# Altium PCB NB3000XN.PcbDoc (part 47 of 71)
Units mil, origin at the board's own origin, x right, y up, seen from the top; angles counter-clockwise.
Board outline 9527.56 x 6929.77 mil, 6 copper layers (Top Layer, GND+SHIELD, MidLayer1, MidLayer2, P2 - 3V3+5V0, Bottom Layer), stack 62.375 mil thick; 832 components, 1027 nets, 4655 pads, 4981 vias.
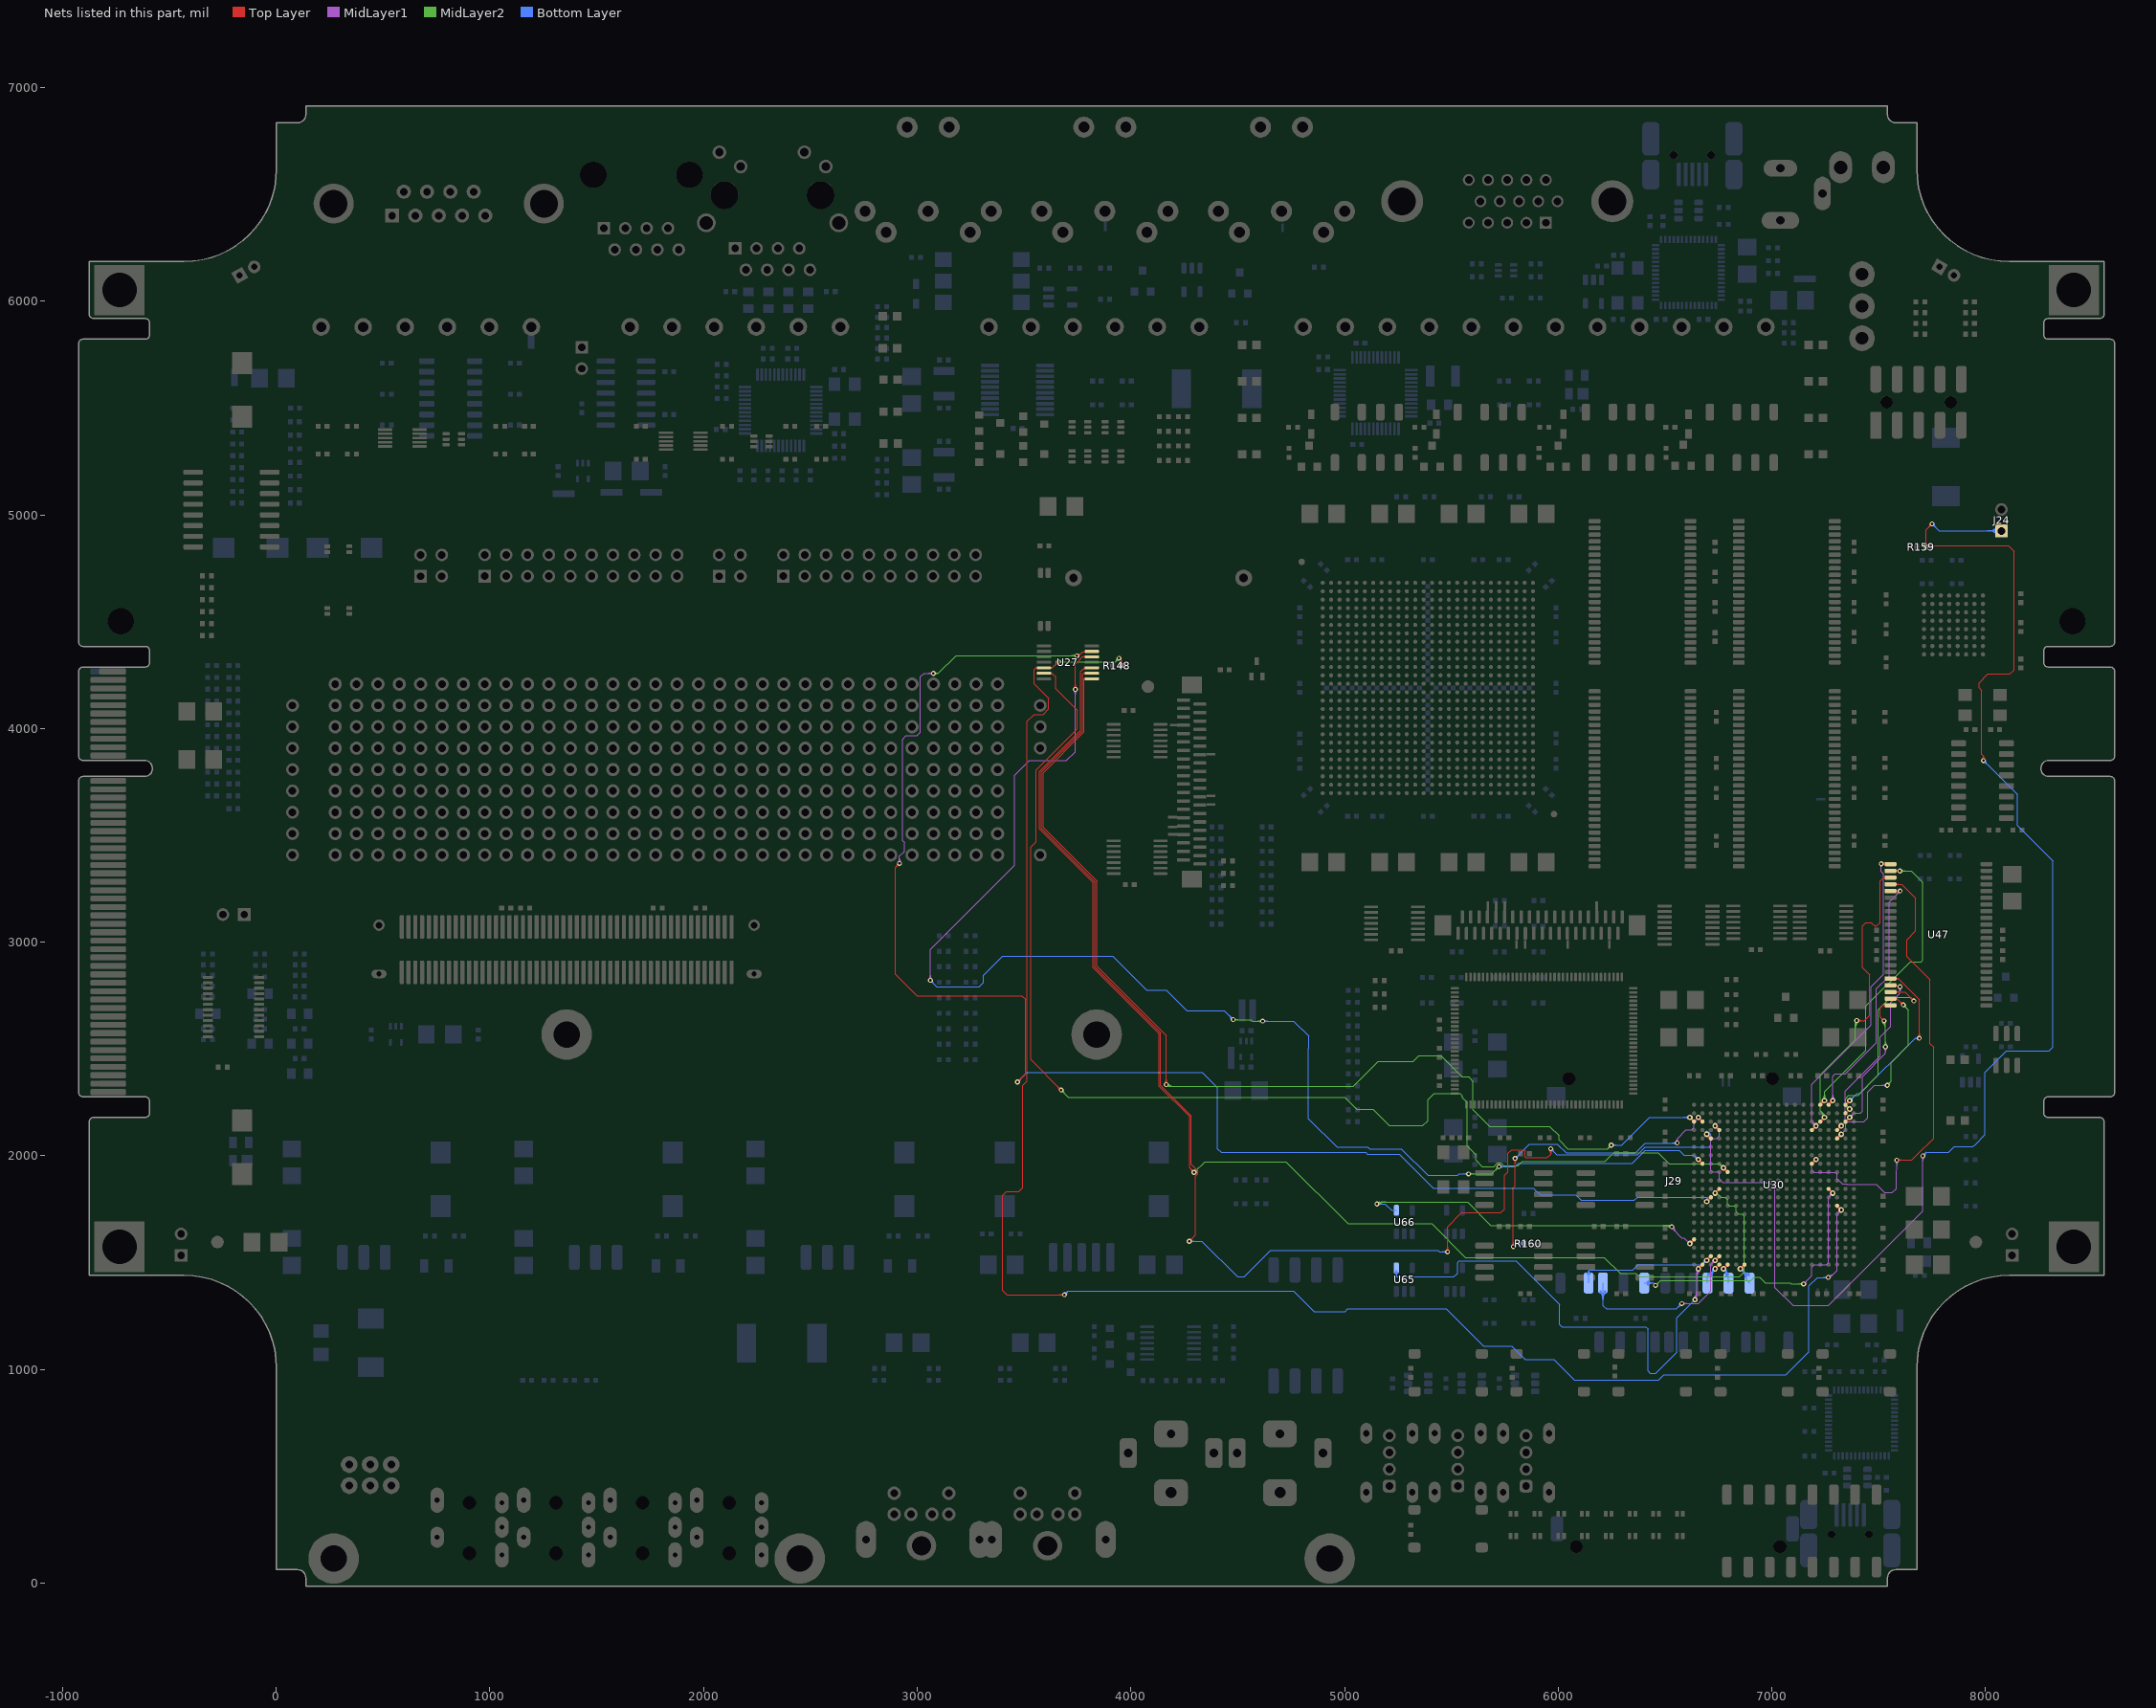
[diagram p51: the nets of this part, all layers, seen from the top]

## Via types
v1: diameter 23, hole 11.81, Top Layer to Bottom Layer, 3672 vias
v2: diameter 26, hole 11.81, Top Layer to Bottom Layer, 461 vias
v3: diameter 19, hole 11.81, Top Layer to Bottom Layer, tented both sides, 396 vias
v4: diameter 23.62, hole 11.81, Top Layer to Bottom Layer, 288 vias
v5: diameter 20, hole 11.81, Top Layer to Bottom Layer, 91 vias
v6: diameter 23, hole 11.81, Top Layer to Bottom Layer, tented both sides, 50 vias
v7: diameter 31, hole 11.81, Top Layer to Bottom Layer, 15 vias
v8: diameter 27.56, hole 11.81, Top Layer to Bottom Layer, tented both sides, 4 vias
v9: diameter 29, hole 11.81, Top Layer to Bottom Layer, 3 vias
v10: diameter 21, hole 11.81, Top Layer to Bottom Layer, 1 vias

## Nets (pads, with @x,y where several pads share a name; then routed paths per layer and width w, separated by ;. In a path a pad name is that pad's centre, name@x,y a point inside that pad or via, vN(x,y) a via of type N, cw(c..) or ccw(c..) an arc to the next point about the centre after c; other vN are vias at no path point) (continued)
HOST_M1: J24.1 R159.1 U30.U4 | length 7649.8
  Top Layer w4: R159.1@7714.59,4857.08 ccw(c7698.68,4872.99) 7721.18,4872.99 ccw(c7743.68,4872.99) R159.1@7727.77,4857.08 ; R159.1@7717.42,4854.25 ccw(c7708.34,4863.33) 7721.18,4863.33 ccw(c7734.02,4863.33) R159.1@7724.94,4854.25 ; R159.1@7722.11,4849.56 cw(c7740.08,4831.6) 7740.08,4857 ; R159.1@7724.94,4846.73 cw(c7749.73,4821.94) 7749.73,4857 ; R159.1@7727.77,4843.9 cw(c7759.39,4812.28) 7759.39,4857 ; v1@7740.69,4958.37 cw(c7717.76,4958.37) 7733.97,4942.16 cw(c7750.19,4925.94) v1@7750.19,4948.87 ; v1@7744.69,4958.37 cw(c7731.41,4958.37) 7740.8,4948.99 cw(c7750.19,4939.6) v1@7750.19,4952.87 ; v1(7750.19,4958.37) 7721.18,4929.37 R159.1@7721.18,4850 7728.18,4857 8107.71,4857 8135,4829.71 8135,4275 8115,4255 8011.82,4255 7970.52,4213.71 7970.52,4190 7981.86,4178.67 7981.86,3880 7990.19,3871.67 ; v1@7983.76,3857.04 ccw(c7970.33,3871.67) 7990.19,3871.67 ; v1@7986.47,3854.09 ccw(c7978.69,3862.56) 7990.19,3862.56 ccw(c8001.69,3862.56) v1@7993.91,3854.09 ; v1(7990.19,3850.04) 7990.19,3871.67 ; v1@7996.62,3857.04 cw(c8010.05,3871.67) 7990.19,3871.67
  Top Layer w8: v2@6734.41,2131.59 cw(c6734.41,2109.86) 6749.77,2125.23 cw(c6765.14,2140.59) v2@6743.41,2140.59 ; v2(6734.41,2140.59) U30.U4@6754.09,2120.91 ; U30.U4@6748.25,2120.91 ccw(c6734.15,2120.91) 6744.12,2130.88 ccw(c6754.09,2140.85) U30.U4@6754.09,2126.75
  MidLayer1 w4: v2@6734.41,2129.59 cw(c6734.41,2103.03) 6753.19,2121.81 cw(c6771.96,2140.59) v2@6745.41,2140.59 ; v2@6734.41,2133.59 cw(c6734.41,2116.69) 6746.36,2128.64 cw(c6758.31,2140.59) v2@6741.41,2140.59 ; v2(6734.41,2140.59) 6753.52,2121.48 6753.52,2091.71 6743.19,2081.37 6726.86,2081.37 6715.19,2069.71 6715.19,1932.37 6723.52,1924.04 6751.86,1924.04 6754.19,1921.71 6754.19,1891.71 6770.86,1875.04 6990.19,1875.04 7015.19,1850.04 7015.19,1383.37 7098.52,1300.04 7265.19,1300.04 7706.86,1741.71 v1(7706.86,2000.04) ; v1@7700.14,1993.32 cw(c7683.92,1977.11) 7706.86,1977.11 cw(c7729.79,1977.11) v1@7713.57,1993.32 ; v1@7702.97,1996.15 cw(c7693.58,1986.76) 7706.86,1986.76 cw(c7720.14,1986.76) v1@7710.75,1996.15
  Bottom Layer w4: v1(7706.86,2000.04) 7723.52,2016.71 7827.77,2016.71 7853.56,2042.5 7940.98,2042.5 7954.24,2055.76 7998.52,2100.04 7998.52,2391.71 8098.52,2491.71 8298.52,2491.71 8315.19,2508.37 8315.19,3380.39 8148.86,3546.73 8148.86,3691.37 8023.52,3816.71 v1(7990.19,3850.04) ; v1@7706.86,2005.54 ccw(c7706.86,2018.82) 7716.25,2009.43 ccw(c7725.64,2000.04) v1@7712.36,2000.04 ; v1@7706.86,2009.54 ccw(c7706.86,2032.48) 7723.07,2016.26 ccw(c7739.29,2000.04) v1@7716.36,2000.04 ; v1@7750.19,4948.87 cw(c7750.19,4925.94) 7766.41,4942.16 cw(c7782.63,4958.37) v1@7759.69,4958.37 ; v1@7750.19,4952.87 cw(c7750.19,4939.6) 7759.58,4948.99 cw(c7768.97,4958.37) v1@7755.69,4958.37 ; v1(7750.19,4958.37) 7783.19,4925.38 J24.1@8074.71,4925.38 ; v1@7990.19,3840.54 cw(c7990.19,3817.61) 8006.41,3833.82 cw(c8022.63,3850.04) v1@7999.69,3850.04 ; v1@7990.19,3844.54 cw(c7990.19,3831.26) 7999.58,3840.65 cw(c8008.97,3850.04) v1@7995.69,3850.04 ; J24.1@8055.24,4905.91 ccw(c8008.25,4858.92) 8008.25,4925.38 ccw(c8008.25,4991.84) J24.1@8055.24,4944.84 ; J24.1@8058.07,4908.74 ccw(c8017.91,4868.58) 8017.91,4925.38 ccw(c8017.91,4982.18) J24.1@8058.07,4942.01 ; J24.1@8060.9,4911.57 ccw(c8027.57,4878.23) 8027.57,4925.38 ccw(c8027.56,4972.52) J24.1@8060.9,4939.19 ; J24.1@8063.73,4914.4 ccw(c8037.22,4887.89) 8037.22,4925.38 ccw(c8037.22,4962.86) J24.1@8063.73,4936.36
HOST_M2: R160.1 U30.W3 | length 1865.2
  Top Layer w4: v1@5783.47,1581.76 ccw(c5767.26,1597.98) 5790.19,1597.98 ccw(c5813.13,1597.98) v1@5796.91,1581.76 ; v1@5786.3,1578.93 ccw(c5776.91,1588.32) 5790.19,1588.32 ccw(c5803.47,1588.32) v1@5794.08,1578.93 ; v1(5790.19,1575.04) 5790.19,1850.04 5798.52,1858.37 v1(5798.52,1988.04) ; v1@5791.81,1981.32 cw(c5775.59,1965.11) 5798.52,1965.11 cw(c5821.46,1965.11) v1@5805.24,1981.32 ; v1@5794.64,1984.15 cw(c5785.25,1974.76) 5798.52,1974.76 cw(c5811.8,1974.76) v1@5802.41,1984.15
  Top Layer w8: v2@6655.67,2170.96 cw(c6655.67,2149.23) 6671.03,2164.6 cw(c6686.4,2179.96) v2@6664.67,2179.96 ; v2(6655.67,2179.96) U30.W3@6675.35,2160.28 ; U30.W3@6669.51,2160.28 ccw(c6655.41,2160.28) 6665.38,2170.25 ccw(c6675.35,2180.22) U30.W3@6675.35,2166.12
  MidLayer1 w4: v1@6551.05,2067.56 ccw(c6541.94,2079.37) 6556.86,2079.37 ; v1(6556.86,2060.04) 6556.86,2079.37 ; v1@6562.66,2067.56 cw(c6571.78,2079.37) 6556.86,2079.37 ; v2(6655.67,2179.96) 6640.19,2164.48 6640.19,2163.48 6638.52,2161.82 6637.52,2161.82 6636.52,2160.82 6636.52,2133.37 6624.19,2121.04 6598.52,2121.04 6556.86,2079.37
  Bottom Layer w4: v1(5790.19,1575.04) 5805.15,1590 R160.1@5839.87,1590 ; v1(5798.52,1988.04) 5843.85,2033.36 5865.48,2055 5996.25,2055 6037.06,2014.19 6362.67,2014.19 6364.86,2016.37 6408.52,2060.04 v1(6556.86,2060.04) ; v1@5798.52,1993.54 ccw(c5798.52,2006.82) 5807.91,1997.43 ccw(c5817.3,1988.04) v1@5804.02,1988.04 ; v1@5798.52,1997.54 ccw(c5798.52,2020.48) 5814.74,2004.26 ccw(c5830.96,1988.04) v1@5808.02,1988.04 ; R160.1@5833.29,1583.41 ccw(c5817.38,1567.5) 5817.38,1590 ccw(c5817.38,1612.5) R160.1@5833.29,1596.59 ; R160.1@5836.11,1586.24 ccw(c5827.03,1577.16) 5827.03,1590 ccw(c5827.03,1602.84) R160.1@5836.11,1593.76 ; v1@6550.14,2053.32 ccw(c6533.92,2037.11) 6533.92,2060.04 ccw(c6533.92,2082.98) v1@6550.14,2066.76 ; v1@6552.97,2056.15 ccw(c6543.58,2046.76) 6543.58,2060.04 ccw(c6543.58,2073.32) v1@6552.97,2063.93
HOST_RTC.CLKOE: U27.12 U30.W8 | length 7212.1
  Top Layer w4: v1@3733.47,4190.09 ccw(c3717.26,4206.31) 3740.19,4206.31 ccw(c3763.13,4206.31) v1@3746.91,4190.09 ; v1@3736.3,4187.26 ccw(c3726.91,4196.65) 3740.19,4196.65 ccw(c3753.47,4196.65) v1@3744.08,4187.26 ; v1(3740.19,4183.37) 3740.19,4300.78 3754.62,4315.21 3775,4335.59 U27.12@3817.2,4335.59 ; U27.12@3787.17,4332.13 ccw(c3778.82,4323.79) 3778.82,4335.59 ccw(c3778.83,4347.39) U27.12@3787.17,4339.05
  Top Layer w8: v2@6655.67,1974.11 cw(c6655.67,1952.38) 6671.03,1967.75 cw(c6686.4,1983.11) v2@6664.67,1983.11 ; v2(6655.67,1983.11) U30.W8@6675.35,1963.43 ; U30.W8@6669.51,1963.43 ccw(c6655.41,1963.43) 6665.38,1973.4 ccw(c6675.35,1983.37) U30.W8@6675.35,1969.27
  MidLayer1 w4: v1@3054.81,2828.43 ccw(c3038.59,2844.64) 3061.52,2844.64 ccw(c3084.46,2844.64) v1@3068.24,2828.43 ; v1@3057.64,2825.6 ccw(c3048.25,2834.99) 3061.52,2834.99 ccw(c3074.8,2834.99) v1@3065.41,2825.6 ; v1(3061.52,2821.71) 3061.52,2966.02 3456.86,3361.36 3456.86,3781 3525.9,3850.04 3698.52,3850.04 3740.19,3891.71 v1(3740.19,4183.37) ; v1@3733.47,4176.66 cw(c3717.26,4160.44) 3740.19,4160.44 cw(c3763.13,4160.44) v1@3746.91,4176.66 ; v1@3736.3,4179.49 cw(c3726.91,4170.1) 3740.19,4170.1 cw(c3753.47,4170.1) v1@3744.08,4179.49
  MidLayer2 w4: v1(4478.86,2638.04) 4563,2638.04 4570,2631.04 v1(4616.86,2631.04) ; v1@4482.75,2634.15 cw(c4492.14,2624.76) 4492.14,2638.04 cw(c4492.14,2651.32) v1@4482.75,2641.93 ; v1@4485.57,2631.32 cw(c4501.79,2615.11) 4501.79,2638.04 cw(c4501.79,2660.98) v1@4485.57,2644.76 ; v1@4610.14,2624.32 ccw(c4593.92,2608.11) 4593.92,2631.04 ccw(c4593.92,2653.98) v1@4610.14,2637.76 ; v1@4612.97,2627.15 ccw(c4603.58,2617.76) 4603.58,2631.04 ccw(c4603.58,2644.32) v1@4612.97,2634.93 ; v1@5580.6,1913.79 v1(5580.6,1915.37) 5688.85,1915.37 v1(5723.52,1950.04) ; v1@5584.49,1911.48 cw(c5593.88,1902.09) 5593.88,1915.37 cw(c5593.88,1928.65) v1@5584.49,1919.26 ; v1@5587.32,1908.65 cw(c5603.54,1892.43) 5603.54,1915.37 cw(c5603.54,1938.3) v1@5587.32,1922.09 ; v1@5714.02,1950.04 cw(c5691.09,1950.04) 5707.31,1933.82 cw(c5723.52,1917.61) v1@5723.52,1940.54 ; v1@5718.02,1950.04 cw(c5704.75,1950.04) 5714.14,1940.65 cw(c5723.52,1931.26) v1@5723.52,1944.54
  Bottom Layer w4: v1@3061.52,2812.21 cw(c3061.52,2789.27) 3077.74,2805.49 cw(c3093.96,2821.71) v1@3071.02,2821.71 ; v1@3061.52,2816.21 cw(c3061.52,2802.93) 3070.91,2812.32 cw(c3080.3,2821.71) v1@3067.02,2821.71 ; v1(3061.52,2821.71) 3091.52,2791.71 3290.19,2791.71 3310.81,2812.32 3310.81,2845.81 3399.37,2934.37 3914.19,2934.37 4073.52,2775.04 4165.19,2775.04 4261.19,2679.04 4437.86,2679.04 v1(4478.86,2638.04) ; v1@4469.36,2638.04 ccw(c4446.42,2638.04) 4462.64,2654.26 ccw(c4478.86,2670.48) v1@4478.86,2647.54 ; v1@4473.36,2638.04 ccw(c4460.08,2638.04) 4469.47,2647.43 ccw(c4478.86,2656.82) v1@4478.86,2643.54 ; v1(4616.86,2631.04) 4761.56,2631.04 4832.19,2560.41 4832.19,2502.81 ; v1@4620.75,2627.15 cw(c4630.14,2617.76) 4630.14,2631.04 cw(c4630.14,2644.32) v1@4620.75,2634.93 ; v1@4623.57,2624.32 cw(c4639.79,2608.11) 4639.79,2631.04 cw(c4639.79,2653.98) v1@4623.57,2637.76 ; 4831.86,2502.81 4831.86,2174.04 4964.19,2041.71 5108.19,2041.71 5116.52,2033.37 5266.15,2033.37 5391.15,1908.37 5530,1908.37 5536.99,1915.37 v1(5580.6,1915.37) v1@5580.6,1913.79 ; v1@5573.88,1908.65 ccw(c5557.67,1892.43) 5557.67,1915.37 ccw(c5557.67,1938.3) v1@5573.88,1922.09 ; v1@5576.71,1911.48 ccw(c5567.32,1902.09) 5567.32,1915.37 ccw(c5567.32,1928.65) v1@5576.71,1919.26 ; v1(5723.52,1950.04) 5798.52,1950.04 5814.52,1966.04 6347.86,1966.04 6406.86,2025.04 6567.52,2025.04 6589.86,2002.71 6636.07,2002.71 v2(6655.67,1983.11) ; v1@5727.41,1946.15 cw(c5736.8,1936.76) 5736.8,1950.04 cw(c5736.8,1963.32) v1@5727.41,1953.93 ; v1@5730.24,1943.32 cw(c5746.46,1927.11) 5746.46,1950.04 cw(c5746.46,1972.98) v1@5730.24,1956.76 ; v2@6644.67,1983.11 ccw(c6618.11,1983.11) 6636.89,2001.89 ccw(c6655.67,2020.67) v2@6655.67,1994.11 ; v2@6648.67,1983.11 ccw(c6631.77,1983.11) 6643.72,1995.06 ccw(c6655.67,2007.01) v2@6655.67,1990.11
HOST_RTC.CLKOUT: U27.13 U30.V12 | length 7676.6
  Top Layer w4: v1@2907.69,3368.71 cw(c2884.76,3368.71) 2900.97,3352.49 cw(c2917.19,3336.27) v1@2917.19,3359.21 ; v1@2911.69,3368.71 cw(c2898.41,3368.71) 2907.8,3359.32 cw(c2917.19,3349.93) v1@2917.19,3363.21 ; v1(2917.19,3368.71) 2898.52,3350.04 2898.52,2850.04 2999.02,2749.54 3490.46,2749.54 3507.19,2732.81 3507.19,2383.71 v1(3469.52,2346.04) ; v1@3469.52,2351.54 ccw(c3469.52,2364.82) 3478.91,2355.43 ccw(c3488.3,2346.04) v1@3475.02,2346.04 ; v1@3469.52,2355.54 ccw(c3469.52,2378.48) 3485.74,2362.26 ccw(c3501.96,2346.04) v1@3479.02,2346.04 ; v1(3747.52,4340.37) 3755.52,4340.37 3773.52,4358.37 ; v1@3747.71,4341.86 ccw(c3749.78,4358.89) 3761.91,4346.76 ; v1@3748.19,4345.83 ccw(c3751.04,4369.24) 3767.72,4352.57 ; v1@3748.67,4349.81 ccw(c3752.3,4379.59) 3773.52,4358.37 ; 3782.42,4358.37 ccw(c3782.42,4368.46) U27.13@3789.96,4361.77 ; U27.13@3786.97,4364.42 cw(c3773.53,4376.34) 3773.53,4358.37 ; U27.13@3817.2,4361.18 3790.63,4361.17 3790.63,4358.37 3773.52,4358.37
  Top Layer w8: v2(6695.04,1786.26) U30.V12@6714.72,1805.94 ; v2@6695.04,1795.26 ccw(c6695.04,1816.99) 6710.4,1801.62 ccw(c6725.77,1786.26) v2@6704.04,1786.26 ; U30.V12@6708.88,1805.94 cw(c6694.78,1805.94) 6704.75,1795.97 cw(c6714.72,1786) U30.V12@6714.72,1800.1
  MidLayer1 w4: v1@2910.47,3375.43 ccw(c2894.26,3391.64) 2917.19,3391.64 ccw(c2940.13,3391.64) v1@2923.91,3375.43 ; v1@2913.3,3372.6 ccw(c2903.91,3381.99) 2917.19,3381.99 ccw(c2930.47,3381.99) v1@2921.08,3372.6 ; v1(2917.19,3368.71) 2917.19,3402.04 2940.19,3425.04 2940.19,3466.71 2931.86,3475.04 2931.86,3950.04 2948.52,3966.71 2998.52,3966.71 3015.19,3983.37 3015.19,4241.71 3031.86,4258.37 v1(3075.86,4258.37) ; v1@3069.14,4251.66 ccw(c3052.92,4235.44) 3052.92,4258.37 ccw(c3052.92,4281.31) v1@3069.14,4265.09 ; v1@3071.97,4254.49 ccw(c3062.58,4245.1) 3062.58,4258.37 ccw(c3062.58,4271.65) v1@3071.97,4262.26
  MidLayer2 w4: v1(3075.86,4258.37) 3098.52,4258.37 ; v1@3079.78,4254.52 cw(c3088.98,4245.47) 3088.98,4258.37 cw(c3088.98,4271.28) v1@3079.78,4262.23 ; v1@3082.63,4251.71 cw(c3098.52,4236.09) 3098.52,4258.37 ; v1@3082.63,4265.04 ccw(c3098.52,4280.66) 3098.52,4258.37 ; 3721.37,4341.71 cw(c3721.37,4314.22) v1@3740.81,4333.66 ; 3727.81,4341.71 ccw(c3727.81,4360.09) v1@3740.81,4347.09 ; 3731.03,4341.71 cw(c3731.03,4323.88) v1@3743.64,4336.49 ; v1(3747.52,4340.37) 3746.19,4341.71 3181.86,4341.71 3098.52,4258.37
  Bottom Layer w4: v1(3469.52,2346.04) 3515.19,2391.71 4334.84,2391.71 4406.52,2320.02 4406.52,2033.16 4422.98,2016.71 5099.25,2016.71 5107.25,2008.71 5256.52,2008.71 5277.07,1988.16 5415.52,1849.71 5883.17,1849.71 5916.17,1816.71 6081.86,1816.71 6106.86,1791.71 6356.86,1791.71 6371.52,1806.37 6696.86,1806.37 6698.52,1804.71 ; v1@3469.52,2351.54 ccw(c3469.52,2364.82) 3478.91,2355.43 ccw(c3488.3,2346.04) v1@3475.02,2346.04 ; v1@3469.52,2355.54 ccw(c3469.52,2378.48) 3485.74,2362.26 ccw(c3501.96,2346.04) v1@3479.02,2346.04 ; v2@6692.43,1796.95 ccw(c6690.53,1804.71) 6698.52,1804.71 ; v2@6693.38,1793.06 ccw(c6691.78,1799.61) 6698.52,1799.61 ; v2(6695.04,1786.26) 6698.52,1786.26 6698.52,1804.71 ; 6698.52,1804.4 ccw(c6713.18,1804.4) v2@6702.82,1794.04
HOST_RTC.CS_N: U27.6 U30.T9 | length 6107.5
  Top Layer w4: U27.6@3592.8,4258.82 3631.41,4258.82 3648.52,4241.71 3648.52,4186.73 3749.19,4086.06 3749.19,3998.34 3557.19,3806.34 3557.19,3470.33 3531.86,3445 3531.86,2450.04 v1(3673.52,2308.37) ; U27.6@3622.83,4255.36 cw(c3631.17,4247.01) 3631.17,4258.82 cw(c3631.18,4270.62) U27.6@3622.83,4262.28 ; v1@3664.02,2308.37 ccw(c3641.09,2308.37) 3657.31,2324.59 ccw(c3673.52,2340.81) v1@3673.52,2317.87 ; v1@3668.02,2308.37 ccw(c3654.75,2308.37) 3664.14,2317.76 ccw(c3673.52,2327.15) v1@3673.52,2313.87
  Top Layer w8: v2@6773.78,1934.74 cw(c6773.78,1913.01) 6789.14,1928.38 cw(c6804.51,1943.74) v2@6782.78,1943.74 ; v2(6773.78,1943.74) U30.T9@6793.46,1924.06 ; U30.T9@6787.62,1924.06 ccw(c6773.52,1924.06) 6783.49,1934.03 ccw(c6793.46,1944) U30.T9@6793.46,1929.9
  MidLayer2 w4: v1@3673.52,2298.87 cw(c3673.52,2275.94) 3689.74,2292.16 cw(c3705.96,2308.37) v1@3683.02,2308.37 ; v1@3673.52,2302.87 cw(c3673.52,2289.6) 3682.91,2298.99 cw(c3692.3,2308.37) v1@3679.02,2308.37 ; v1(3673.52,2308.37) 3707.19,2274.71 5001.84,2274.71 5057.53,2219.02 5132.88,2219.02 5210.19,2141.71 5366.9,2141.71 5390.19,2165 5390.19,2263.04 5418.86,2291.71 5540.19,2291.71 5552.19,2279.71 5552.19,2272.62 5575,2249.81 5575,2045 5614.02,2005.98 5614.02,1980 5644.02,1950 5698.73,1950 5716.28,1967.54 5730.77,1967.54 5743.77,1954.54 5812.4,1954.54 5831.57,1973.71 6219.57,1973.71 6260.05,2014.19 6467.71,2014.19 6518.86,1963.04 6754.48,1963.04 v2(6773.78,1943.74) ; v2@6762.78,1943.74 ccw(c6736.22,1943.74) 6755,1962.52 ccw(c6773.78,1981.3) v2@6773.78,1954.74 ; v2@6766.78,1943.74 ccw(c6749.88,1943.74) 6761.83,1955.69 ccw(c6773.78,1967.64) v2@6773.78,1950.74
HOST_RTC.DIN: U27.9 U30.V5 | length 6833.9
  Top Layer w4: U27.9@3787.17,4255.36 ccw(c3778.83,4247.01) 3778.83,4258.82 ; U27.9@3787.17,4262.28 cw(c3778.82,4270.62) 3778.82,4258.82 ; U27.9@3817.2,4258.82 3778.82,4258.82 ; v1(4273.52,1600.04) 4303.2,1629.72 4303.2,1905.16 4313.46,1915.41 4313.46,1929.91 4282.52,1960.84 4282.52,2187.48 4140,2330 4140,2575.9 3832,2883.9 3832,3282.56 3581.19,3533.37 3581.19,3796.39 3773.52,3988.73 3773.52,4253.52 3778.82,4258.82 ; v1@4273.52,1605.54 ccw(c4273.52,1618.82) 4282.91,1609.43 ccw(c4292.3,1600.04) v1@4279.02,1600.04 ; v1@4273.52,1609.54 ccw(c4273.52,1632.48) 4289.74,1616.26 ccw(c4305.96,1600.04) v1@4283.02,1600.04 ; v1(5481.86,1550.04) 5481.86,1666.71 5548.52,1733.37 5731.86,1733.37 5748.52,1750.04 5748.52,1908.37 5765.19,1925.04 5765.19,2011.71 5781.86,2028.37 5843.86,2028.37 5845.52,2026.71 5845.52,1993.37 5847.19,1991.71 5948.52,1991.71 5965.19,2008.37 v1(5965.19,2033.37) ; v1@5958.47,2026.66 cw(c5942.26,2010.44) 5965.19,2010.44 cw(c5988.13,2010.44) v1@5971.91,2026.66 ; v1@5961.3,2029.49 cw(c5951.91,2020.1) 5965.19,2020.1 cw(c5978.47,2020.1) v1@5969.08,2029.49 ; 5481.86,1563.32 cw(c5468.58,1563.32) 5477.97,1553.93 ccw(c5468.58,1563.32) 5481.86,1563.32 ; 5481.86,1563.32 ccw(c5495.14,1563.32) 5485.75,1553.93 cw(c5495.14,1563.32) 5481.86,1563.32 ; 5481.86,1572.98 cw(c5458.92,1572.98) 5475.14,1556.76 ccw(c5458.92,1572.98) 5481.86,1572.98 ; 5481.86,1572.98 ccw(c5504.79,1572.98) 5488.57,1556.76 cw(c5504.79,1572.98) 5481.86,1572.98
  Top Layer w8: v2@6695.04,2092.22 cw(c6695.04,2070.49) 6710.4,2085.86 cw(c6725.77,2101.22) v2@6704.04,2101.22 ; v2(6695.04,2101.22) U30.V5@6714.72,2081.54 ; U30.V5@6708.88,2081.54 ccw(c6694.78,2081.54) 6704.75,2091.51 ccw(c6714.72,2101.48) U30.V5@6714.72,2087.38
  Bottom Layer w4: v1(4273.52,1600.04) 4331.86,1600.04 4498.52,1433.37 4530,1433.37 4600.69,1504.06 4653.63,1557 5438,1557 5444.96,1550.04 v1(5481.86,1550.04) ; v1@4277.41,1596.15 cw(c4286.8,1586.76) 4286.8,1600.04 cw(c4286.8,1613.32) v1@4277.41,1603.93 ; v1@4280.24,1593.32 cw(c4296.46,1577.11) 4296.46,1600.04 cw(c4296.46,1622.98) v1@4280.24,1606.76 ; v1@5475.14,1543.32 ccw(c5458.92,1527.11) 5458.92,1550.04 ccw(c5458.92,1572.98) v1@5475.14,1556.76 ; v1@5477.97,1546.15 ccw(c5468.58,1536.76) 5468.58,1550.04 ccw(c5468.58,1563.32) v1@5477.97,1553.93 ; v1@5965.19,2023.87 cw(c5965.19,2000.94) 5981.41,2017.16 cw(c5997.63,2033.37) v1@5974.69,2033.37 ; v1@5965.19,2027.87 cw(c5965.19,2014.6) 5974.58,2023.99 cw(c5983.97,2033.37) v1@5970.69,2033.37 ; v1(5965.19,2033.37) 5992.38,2006.19 6371.34,2006.19 6406.86,2041.71 6706.86,2041.71 6715.19,2050.04 6715.19,2100.04 6706.86,2108.37 6695.04,2108.37 v2(6695.04,2101.22) ; 6687.37,2111.71 cw(c6695.33,2100.82) 6704.87,2110.36 ; v2@6689.73,2108.49 cw(c6698.12,2097.01) 6708.17,2107.06 ; v2@6692.09,2105.26 cw(c6700.91,2093.2) 6711.47,2103.76 ; v2@6694.45,2102.03 cw(c6703.7,2089.38) 6714.77,2100.46
HOST_RTC.DOUT: U27.8 U30.Y3 | length 5564
  Top Layer w4: U27.8@3786.55,4230.53 ccw(c3781.52,4227.19) 3781.52,4233.23 ; U27.8@3786.55,4235.93 cw(c3781.52,4239.26) 3781.52,4233.23 ; U27.8@3817.2,4233.23 3781.52,4233.23 ; 3840,3205 3840,3285.88 3589.19,3536.69 3589.19,3793.08 3781.52,3985.41 3781.52,4233.23 ; 3840.19,3205 3840.19,2887.02 4165.19,2562.02 v1(4165.19,2333.37) ; v1@4158.47,2340.09 ccw(c4142.26,2356.31) 4165.19,2356.31 ccw(c4188.13,2356.31) v1@4171.91,2340.09 ; v1@4161.3,2337.26 ccw(c4151.91,2346.65) 4165.19,2346.65 ccw(c4178.47,2346.65) v1@4169.08,2337.26
  Top Layer w8: v2@6616.3,2170.96 cw(c6616.3,2149.23) 6631.66,2164.6 cw(c6647.03,2179.96) v2@6625.3,2179.96 ; v2(6616.3,2179.96) U30.Y3@6635.98,2160.28 ; U30.Y3@6630.14,2160.28 ccw(c6616.04,2160.28) 6626.01,2170.25 ccw(c6635.98,2180.22) U30.Y3@6635.98,2166.12
  MidLayer2 w4: v1@4163.42,2331.61 ccw(c4179.27,2347.46) 4179.27,2325.04 ; v1(4165.19,2333.37) 4173.52,2325.04 5041.35,2325.04 5158.02,2441.71 5321.52,2441.71 5348.52,2468.71 5451.29,2468.71 5550,2370 5580,2370 5602.19,2347.81 5602.19,2275 ; v1@4166.25,2334.44 ccw(c4188.93,2357.12) 4188.93,2325.04 ; v1@4169.08,2337.26 ccw(c4198.59,2366.77) 4198.59,2325.04 ; v1@4171.91,2340.09 ccw(c4208.25,2376.43) 4208.25,2325.04 ; 5602.19,2290 5602.19,2275 ; v1@6239.02,2050.04 cw(c6216.09,2050.04) 6232.31,2033.82 cw(c6248.52,2017.61) v1@6248.52,2040.54 ; v1@6243.02,2050.04 cw(c6229.75,2050.04) 6239.13,2040.65 cw(c6248.52,2031.26) v1@6248.52,2044.54 ; v1(6248.52,2050.04) 6231.86,2033.37 6045.56,2033.37 6004.5,2074.44 6004.5,2094.06 5960.19,2138.37 5678.81,2138.37 5602.19,2215 5602.19,2275
  Bottom Layer w4: v1(6248.52,2050.04) 6298.52,2050.04 6428.44,2179.96 v2(6616.3,2179.96) ; v1@6252.41,2046.15 cw(c6261.8,2036.76) 6261.8,2050.04 cw(c6261.8,2063.32) v1@6252.41,2053.93 ; v1@6255.24,2043.32 cw(c6271.46,2027.11) 6271.46,2050.04 cw(c6271.46,2072.98) v1@6255.24,2056.76 ; v2@6608.52,2172.18 ccw(c6589.74,2153.4) 6589.74,2179.96 ccw(c6589.74,2206.52) v2@6608.52,2187.74 ; v2@6611.35,2175.01 ccw(c6599.4,2163.06) 6599.4,2179.96 ccw(c6599.4,2196.86) v2@6611.35,2184.91
HOST_RTC.INT_N: R148.2 U27.5 U30.C13 | length 8985.1
  Top Layer w4: U27.5@3562.29,4281.5 ccw(c3556.52,4277.24) 3556.52,4284.41 ; U27.5@3562.29,4287.32 cw(c3556.52,4291.58) 3556.52,4284.41 ; U27.5@3622.83,4280.95 cw(c3631.17,4272.61) 3631.17,4284.41 cw(c3631.18,4296.22) U27.5@3622.83,4287.87 ; v1@3652.02,4312.37 cw(c3629.09,4312.37) 3645.31,4296.16 cw(c3661.52,4279.94) v1@3661.52,4302.87 ; v1@3656.02,4312.37 cw(c3642.75,4312.37) 3652.14,4302.99 cw(c3661.52,4293.6) v1@3661.52,4306.87 ; v1(3661.52,4312.37) 3633.56,4284.41 3556.52,4284.41 ; v1@3682.47,1343.32 ccw(c3666.26,1327.11) 3666.26,1350.04 ccw(c3666.26,1372.98) v1@3682.47,1356.76 ; v1@3685.3,1346.15 ccw(c3675.91,1336.76) 3675.91,1350.04 ccw(c3675.91,1363.32) v1@3685.3,1353.93 ; v1(3689.19,1350.04) 3419.96,1350.04 3400,1370 3400,1815 3418,1833 3476.69,1833 3495,1851.31 3495,2329.81 3515.19,2350 3515.19,4033.37 3548.52,4066.71 3590.19,4066.71 3615.19,4091.71 3615.19,4141.71 3548.52,4208.37 3548.52,4276.41 3556.52,4284.41 ; v1(3944.52,4329.37) 3956.18,4317.72 ; R148.2@3949.65,4302.14 ccw(c3934.34,4317.72) 3956.18,4317.72 ; R148.2@3952.45,4299.29 ccw(c3943.71,4308.18) 3956.18,4308.18 ccw(c3968.65,4308.18) R148.2@3959.91,4299.29 ; R148.2@3956.18,4295 3956.18,4317.72 ; R148.2@3962.71,4302.14 cw(c3978.02,4317.72) 3956.18,4317.72
  Top Layer w8: U30.C13@7305.28,1760.73 cw(c7305.28,1746.63) 7315.25,1756.6 cw(c7325.22,1766.57) U30.C13@7311.12,1766.57 ; U30.C13@7305.28,1766.57 v2(7324.96,1746.89) ; v2@7315.96,1746.89 ccw(c7294.23,1746.89) 7309.6,1762.25 ccw(c7324.96,1777.62) v2@7324.96,1755.89
  MidLayer1 w4: v1(7263.86,1431.04) 7272.2,1431.04 7305,1463.84 7305,1726.93 v2(7324.96,1746.89) ; v1@7263.86,1432.54 ccw(c7263.86,1456.31) 7280.66,1439.5 ; v1@7263.86,1436.54 ccw(c7263.86,1469.97) 7287.49,1446.33 ; v1@7263.86,1440.54 ccw(c7263.86,1483.62) 7294.32,1453.16 ; v2@7313.96,1746.89 cw(c7287.4,1746.89) 7306.18,1728.11 cw(c7324.96,1709.33) v2@7324.96,1735.89 ; v2@7317.96,1746.89 cw(c7301.06,1746.89) 7313.01,1734.94 cw(c7324.96,1722.99) v2@7324.96,1739.89
  MidLayer2 w4: v1(3661.52,4312.37) 3927.52,4312.37 v1(3944.52,4329.37) ; v1@3665.41,4308.49 cw(c3674.8,4299.1) 3674.8,4312.37 cw(c3674.8,4325.65) v1@3665.41,4316.26 ; v1@3668.24,4305.66 cw(c3684.46,4289.44) 3684.46,4312.37 cw(c3684.46,4335.31) v1@3668.24,4319.09 ; v1@3935.02,4329.37 cw(c3912.09,4329.37) 3928.31,4313.16 cw(c3944.52,4296.94) v1@3944.52,4319.87 ; v1@3939.02,4329.37 cw(c3925.75,4329.37) 3935.14,4319.99 cw(c3944.52,4310.6) v1@3944.52,4323.87
  Bottom Layer w4: v1(3689.19,1350.04) 3706.19,1367.04 4761.88,1367.04 4856.92,1272 5003.31,1272 5014.69,1283.37 5475.9,1283.37 5650.27,1109 5783.6,1109 5838.8,1053.8 5845.6,1047 5979.56,1047 6076.52,950.04 6469.82,950.04 6494.82,975.04 7065.04,975.04 7173.52,1083.52 7173.52,1391.71 7212.86,1431.04 v1(7263.86,1431.04) ; v1@3689.19,1355.54 ccw(c3689.19,1368.82) 3698.58,1359.43 ccw(c3707.97,1350.04) v1@3694.69,1350.04 ; v1@3689.19,1359.54 ccw(c3689.19,1382.48) 3705.41,1366.26 ccw(c3721.63,1350.04) v1@3698.69,1350.04 ; v1@7257.14,1424.32 ccw(c7240.92,1408.11) 7240.92,1431.04 ccw(c7240.92,1453.98) v1@7257.14,1437.76 ; v1@7259.97,1427.15 ccw(c7250.58,1417.76) 7250.58,1431.04 ccw(c7250.58,1444.32) v1@7259.97,1434.93
HOST_RTC.SCLK: U27.10 U30.U11 | length 6377.7
  Top Layer w4: 3769.07,4270.59 cw(c3790.63,4249.03) U27.10@3790.63,4279.52 ; 3775.9,4277.42 cw(c3790.63,4262.69) U27.10@3790.63,4283.52 ; 3777.99,4279.51 cw(c3783.45,4274.05) U27.10@3787.84,4280.39 ; 3781.38,4282.89 cw(c3786.22,4278.05) U27.10@3790.12,4283.68 ; 3782.73,4284.25 cw(c3790.63,4276.35) U27.10@3790.63,4287.52 ; U27.10@3786.09,4286.24 cw(c3781.86,4287.94) 3781.86,4283.37 ; U27.10@3787.03,4281.1 ccw(c3781.86,4276.36) 3781.86,4283.37 ; U27.10@3817.2,4284.41 3823.52,4284.41 3823.52,4283.37 3781.86,4283.37 ; v1@4286.46,1922.66 ccw(c4263.52,1922.66) 4279.74,1938.88 ccw(c4295.96,1955.1) v1@4295.96,1932.16 ; v1@4290.46,1922.66 ccw(c4277.18,1922.66) 4286.57,1932.05 ccw(c4295.96,1941.44) v1@4295.96,1928.16 ; v1(4295.96,1922.66) 4274.52,1944.09 4274.52,2184.16 4132,2326.69 4132,2572.58 3824,2880.58 3824,3279.25 3573.19,3530.06 3573.19,3799.71 3765.19,3991.71 3765.19,4266.71 3781.86,4283.37
  Top Layer w8: v2(6734.41,1825.63) U30.U11@6754.09,1845.31 ; v2@6734.41,1834.63 ccw(c6734.41,1856.36) 6749.77,1840.99 ccw(c6765.14,1825.63) v2@6743.41,1825.63 ; U30.U11@6748.25,1845.31 cw(c6734.15,1845.31) 6744.12,1835.34 cw(c6754.09,1825.37) U30.U11@6754.09,1839.47
  MidLayer2 w4: v1(4295.96,1922.66) v1@4291.48,1927.14 ; v1@4295.96,1928.16 ccw(c4295.96,1941.44) 4305.34,1932.05 ccw(c4314.73,1922.66) v1@4301.46,1922.66 ; v1@4295.96,1932.16 ccw(c4295.96,1955.1) 4312.17,1938.88 ccw(c4328.39,1922.66) v1@4305.46,1922.66 ; v2(6734.41,1825.63) 6740.27,1825.63 6760.52,1805.37 6781.86,1805.37 6792.86,1794.37 6792.86,1775.04 6801.19,1766.71 6823.86,1766.71 6832.19,1758.37 6832.19,1740.04 6844.86,1727.37 6861.19,1727.37 6871.86,1716.71 6871.86,1456.71 6848.52,1433.37 6380.19,1433.37 6363.52,1450.04 6289.96,1450.04 6214.96,1525.04 5565.8,1525.04 5408.13,1682.71 5016.47,1682.71 4726.36,1972.81 4346.1,1972.81 4300.43,1927.14 v1@4291.48,1927.14 ; v1@4291.48,1927.14 4291.36,1927.26 v1@4291.48,1927.14
HOST_SD.CLK: J29.5 U30.D11 | length 1757.9
  Top Layer w8: U30.D11@7265.91,1839.47 cw(c7265.91,1825.37) 7275.88,1835.34 cw(c7285.85,1845.31) U30.D11@7271.75,1845.31 ; U30.D11@7265.91,1845.31 v2(7285.59,1825.63) ; v2@7276.59,1825.63 ccw(c7254.86,1825.63) 7270.23,1840.99 ccw(c7285.59,1856.36) v2@7285.59,1834.63
  MidLayer1 w4: v1(7148.52,1400.04) 7187.52,1439.04 7187.52,1479.37 7198.52,1490.37 7256.86,1490.37 7265.86,1499.37 7265.86,1805.9 v2(7285.59,1825.63) ; v1@7148.52,1405.54 ccw(c7148.52,1418.82) 7157.91,1409.43 ccw(c7167.3,1400.04) v1@7154.02,1400.04 ; v1@7148.52,1409.54 ccw(c7148.52,1432.48) 7164.74,1416.26 ccw(c7180.96,1400.04) v1@7158.02,1400.04 ; v2@7274.59,1825.63 cw(c7248.03,1825.63) 7266.81,1806.85 cw(c7285.59,1788.07) v2@7285.59,1814.63 ; v2@7278.59,1825.63 cw(c7261.69,1825.63) 7273.64,1813.68 cw(c7285.59,1801.73) v2@7285.59,1818.63
  MidLayer2 w4: v1(6455.86,1393.71) 6478.86,1416.71 6902.52,1416.71 6917.19,1431.37 6942.19,1431.37 6968.56,1405 7085.04,1405 7090,1400.04 v1(7148.52,1400.04) ; v1@6455.86,1399.21 ccw(c6455.86,1412.49) 6465.25,1403.1 ccw(c6474.64,1393.71) v1@6461.36,1393.71 ; v1@6455.86,1403.21 ccw(c6455.86,1426.14) 6472.07,1409.93 ccw(c6488.29,1393.71) v1@6465.36,1393.71 ; v1@7141.81,1393.32 ccw(c7125.59,1377.11) 7125.59,1400.04 ccw(c7125.59,1422.98) v1@7141.81,1406.76 ; v1@7144.64,1396.15 ccw(c7135.25,1386.76) 7135.25,1400.04 ccw(c7135.25,1413.32) v1@7144.64,1403.93
  Bottom Layer w4: J29.5@6403.32,1404.65 6444.91,1404.65 ; J29.5@6413.6,1396.97 cw(c6428.94,1385.5) 6428.94,1404.65 cw(c6428.94,1423.8) J29.5@6413.6,1412.34 ; J29.5@6416.81,1394.57 cw(c6436.93,1379.53) 6436.93,1404.65 cw(c6436.93,1429.77) J29.5@6416.81,1414.73 ; J29.5@6420.01,1392.18 cw(c6444.91,1373.56) 6444.91,1404.65 ; J29.5@6420.01,1417.13 ccw(c6444.91,1435.74) 6444.91,1404.65 ; v1(6455.86,1393.71) 6444.91,1404.65
HOST_SD.CMD: J29.2 U30.U20 | length 433.7
  Top Layer w8: v2(6734.41,1471.3) U30.U20@6754.09,1490.98 ; v2@6734.41,1480.3 ccw(c6734.41,1502.03) 6749.77,1486.66 ccw(c6765.14,1471.3) v2@6743.41,1471.3 ; U30.U20@6748.25,1490.98 cw(c6734.15,1490.98) 6744.12,1481.01 cw(c6754.09,1471.04) U30.U20@6754.09,1485.14
  Bottom Layer w4: J29.2@6698.99,1404.65 6698.99,1435.88 v2(6734.41,1471.3) ccw(c6769.98,1435.72) J29.2@6719.78,1432.4 ; J29.2@6698.99,1443.87 ccw(c6698.99,1463.14) J29.2@6712.62,1449.51 ; J29.2@6698.99,1447.87 ccw(c6698.99,1476.8) 6719.45,1456.34 ; J29.2@6698.99,1451.87 ccw(c6698.99,1490.46) v2@6726.28,1463.17 ; J29.2@6707.81,1431.61 cw(c6734.87,1433.4) 6715.69,1452.58 ; J29.2@6711.8,1431.88 cw(c6746.58,1434.17) 6721.93,1458.82 ; J29.2@6715.79,1432.14 cw(c6758.28,1434.95) v2@6728.17,1465.06 ; 6722.46,1459.35 ccw(c6710.51,1471.3) v2@6727.41,1471.3 ; 6722.46,1459.35 cw(c6734.41,1447.4) v2@6734.41,1464.3 ; v2@6723.41,1471.3 cw(c6696.85,1471.3) 6715.63,1452.52 cw(c6734.41,1433.75) v2@6734.41,1460.3
HOST_SD.DAT0: J29.7 U30.U19 | length 1266.4
  Top Layer w8: v2(6734.41,1510.67) U30.U19@6754.09,1530.35 ; v2@6734.41,1519.67 ccw(c6734.41,1541.4) 6749.77,1526.03 ccw(c6765.14,1510.67) v2@6743.41,1510.67 ; U30.U19@6748.25,1530.35 cw(c6734.15,1530.35) 6744.12,1520.38 cw(c6754.09,1510.41) U30.U19@6754.09,1524.51
  MidLayer1 w4: v1(6578.86,1308.37) 6656.86,1308.37 6715.19,1366.71 6715.19,1491.45 6726.78,1503.04 6734.41,1503.04 v2(6734.41,1510.67) ; v1@6582.75,1304.49 cw(c6592.14,1295.1) 6592.14,1308.37 cw(c6592.14,1321.65) v1@6582.75,1312.26 ; v1@6585.57,1301.66 cw(c6601.79,1285.44) 6601.79,1308.37 cw(c6601.79,1331.31) v1@6585.57,1315.09 ; v2@6723.41,1510.67 cw(c6696.85,1510.67) 6715.63,1491.89 cw(c6734.41,1473.12) v2@6734.41,1499.67 ; v2@6727.41,1510.67 cw(c6710.51,1510.67) 6722.46,1498.72 cw(c6734.41,1486.77) v2@6734.41,1503.67
  Bottom Layer w4: J29.7@6194.89,1363.54 cw(c6159.32,1327.98) 6209.62,1327.98 cw(c6259.92,1327.98) J29.7@6224.35,1363.54 ; J29.7@6197.72,1366.37 cw(c6168.98,1337.63) 6209.62,1337.63 cw(c6250.26,1337.63) J29.7@6221.53,1366.37 ; J29.7@6200.55,1369.2 cw(c6178.64,1347.29) 6209.62,1347.29 cw(c6240.61,1347.29) J29.7@6218.7,1369.2 ; J29.7@6209.62,1404.65 6209.62,1298.75 6225,1283.37 6553.86,1283.37 v1(6578.86,1308.37) ; v1@6569.36,1308.37 cw(c6546.42,1308.37) 6562.64,1292.16 cw(c6578.86,1275.94) v1@6578.86,1298.87 ; v1@6573.36,1308.37 cw(c6560.08,1308.37) 6569.47,1298.99 cw(c6578.86,1289.6) v1@6578.86,1302.87
HOST_SD.DAT1: J29.8 U30.V19 | length 840.1
  Top Layer w8: v2(6695.04,1510.67) U30.V19@6714.72,1530.35 ; v2@6695.04,1519.67 ccw(c6695.04,1541.4) 6710.4,1526.03 ccw(c6725.77,1510.67) v2@6704.04,1510.67 ; U30.V19@6708.88,1530.35 cw(c6694.78,1530.35) 6704.75,1520.38 cw(c6714.72,1510.41) U30.V19@6714.72,1524.51
  Bottom Layer w4: J29.8@6134.45,1450.17 ccw(c6129.05,1462.69) 6142.69,1462.69 ; J29.8@6136.03,1446.49 ccw(c6131.67,1456.61) 6142.69,1456.61 ccw(c6153.71,1456.61) J29.8@6149.35,1446.49 ; J29.8@6142.69,1404.65 6142.69,1462.69 ; J29.8@6150.94,1450.17 cw(c6156.33,1462.69) 6142.69,1462.69 ; v2@6684.04,1510.67 cw(c6657.48,1510.67) 6676.26,1491.89 cw(c6695.04,1473.12) v2@6695.04,1499.67 ; v2@6688.04,1510.67 cw(c6671.14,1510.67) 6683.09,1498.72 cw(c6695.04,1486.77) v2@6695.04,1503.67 ; v2(6695.04,1510.67) 6675.41,1491.04 6374.19,1491.04 6349.86,1466.71 6146.71,1466.71 6142.69,1462.69
HOST_SD.DAT2: J29.9 U30.P20 | length 451
  Top Layer w8: v2(6852.52,1471.3) U30.P20@6872.2,1490.98 ; v2@6852.52,1480.3 ccw(c6852.52,1502.03) 6867.88,1486.66 ccw(c6883.25,1471.3) v2@6861.52,1471.3 ; U30.P20@6866.36,1490.98 cw(c6852.26,1490.98) 6862.23,1481.01 cw(c6872.2,1471.04) U30.P20@6872.2,1485.14
  Bottom Layer w4: v2@6852.52,1460.3 cw(c6852.52,1433.74) 6871.3,1452.52 cw(c6890.08,1471.3) v2@6863.52,1471.3 ; v2@6852.52,1464.3 cw(c6852.52,1447.4) 6864.47,1459.35 cw(c6876.42,1471.3) v2@6859.52,1471.3 ; v2(6852.52,1471.3) 6881.86,1441.96 6881.86,1418.64 J29.9@6895.84,1404.65 ; v2@6855.06,1468.76 ccw(c6895.84,1509.54) J29.9@6895.84,1451.87 ; 6861.89,1461.93 ccw(c6895.84,1495.89) J29.9@6895.84,1447.87 ; 6862.44,1461.38 cw(c6832.09,1431.03) J29.9@6875.01,1431.03 ; 6868.72,1455.1 ccw(c6895.84,1482.23) J29.9@6895.84,1443.87 ; 6869.27,1454.55 cw(c6845.74,1431.03) J29.9@6879.01,1431.03 ; J29.9@6875.54,1448.27 ccw(c6895.84,1468.57) J29.9@6895.84,1439.87 ; J29.9@6876.09,1447.72 cw(c6859.4,1431.03) J29.9@6883.01,1431.03
HOST_SD.DAT3: J29.1 U30.T20 | length 365.1
  Top Layer w8: v2(6773.78,1471.3) U30.T20@6793.46,1490.98 ; v2@6773.78,1480.3 ccw(c6773.78,1502.03) 6789.14,1486.66 ccw(c6804.51,1471.3) v2@6782.78,1471.3 ; U30.T20@6787.62,1490.98 cw(c6773.52,1490.98) 6783.49,1481.01 cw(c6793.46,1471.04) U30.T20@6793.46,1485.14
  Bottom Layer w4: v2@6773.78,1460.3 cw(c6773.78,1433.74) 6792.56,1452.52 cw(c6811.34,1471.3) v2@6784.78,1471.3 ; v2@6773.78,1464.3 cw(c6773.78,1447.4) 6785.73,1459.35 ; v2(6773.78,1471.3) 6797.42,1447.66 J29.1@6797.42,1404.65 ; v2@6775.35,1469.73 cw(c6749.19,1443.57) J29.1@6785,1434.26 ; v2@6780.29,1464.79 cw(c6757.03,1441.53) J29.1@6788.87,1433.25 ; v2@6780.78,1471.3 ccw(c6797.68,1471.3) 6785.73,1459.35 ; 6785.23,1459.85 cw(c6764.88,1439.49) J29.1@6792.74,1432.25 ; 6790.17,1454.9 cw(c6772.72,1437.45) J29.1@6796.61,1431.24 ; 6790.24,1454.84 ccw(c6797.42,1462.02) J29.1@6797.42,1451.87
HOST_SD.DETECT: U30.Y17 U66.4 | length 2029.9
  Top Layer w8: v2(6616.3,1589.41) U30.Y17@6635.98,1609.09 ; v2@6616.3,1598.41 ccw(c6616.3,1620.14) 6631.66,1604.77 ccw(c6647.03,1589.41) v2@6625.3,1589.41 ; U30.Y17@6630.14,1609.09 cw(c6616.04,1609.09) 6626.01,1599.12 cw(c6635.98,1589.15) U30.Y17@6635.98,1603.25
  MidLayer1 w4: v1@6531.86,1658.21 cw(c6531.86,1648.15) 6538.97,1655.26 ; v1(6531.86,1667.71) 6531.86,1662.37 6578.12,1616.11 6589.6,1616.11 v2(6616.3,1589.41) ; v1@6533.36,1667.71 ccw(c6549.85,1667.71) 6538.19,1656.04 ; v1@6537.36,1667.71 ccw(c6563.51,1667.71) 6545.02,1649.21 ; v1@6541.36,1667.71 ccw(c6577.17,1667.71) 6551.85,1642.39
  MidLayer2 w4: v1@5149.76,1776.81 cw(c5165.61,1760.96) 5165.61,1783.37 ; v1(5151.52,1775.04) 5159.86,1783.37 5576.63,1783.37 5684.96,1675.04 6524.52,1675.04 v1(6531.86,1667.71) ; v1@5152.58,1773.98 cw(c5175.27,1751.3) 5175.27,1783.37 ; v1@5155.41,1771.15 cw(c5184.92,1741.64) 5184.92,1783.37 ; v1@5158.24,1768.32 cw(c5194.58,1731.99) 5194.58,1783.37 ; 6491.22,1675.04 cw(c6491.22,1627.07) v1@6525.14,1660.99 ; 6500.88,1675.04 cw(c6500.88,1636.73) v1@6527.97,1663.82 ; 6510.53,1675.04 cw(c6510.53,1646.38) v1@6530.8,1666.65 ; 6520.19,1675.04 cw(c6520.19,1656.04) v1@6533.62,1669.48
  Bottom Layer w4: v1(5151.52,1775.04) 5189.96,1775.04 5219.88,1745.12 U66.4@5242.6,1745.12
HOST_SD.PROTECT: U30.W20 U65.4 | length 2643
  Top Layer w8: v2(6655.67,1471.3) U30.W20@6675.35,1490.98 ; v2@6655.67,1480.3 ccw(c6655.67,1502.03) 6671.03,1486.66 ccw(c6686.4,1471.3) v2@6664.67,1471.3 ; U30.W20@6669.51,1490.98 cw(c6655.41,1490.98) 6665.38,1481.01 cw(c6675.35,1471.04) U30.W20@6675.35,1485.14
  MidLayer1 w4: v1@6633.47,1333.43 ccw(c6597.14,1369.76) 6648.52,1369.76 ; v1@6636.3,1330.6 ccw(c6606.79,1360.11) 6648.52,1360.11 ; v1@6639.13,1327.77 ccw(c6616.45,1350.45) 6648.52,1350.45 ; v1(6640.19,1326.71) 6648.52,1335.04 6648.52,1471.3 v2(6655.67,1471.3) ; v1@6641.96,1324.94 ccw(c6626.11,1340.79) 6648.52,1340.79 ; 6648.52,1427.49 cw(c6699.48,1427.49) v2@6663.45,1463.52 ; 6648.52,1437.15 cw(c6689.82,1437.15) v2@6660.62,1466.35 ; 6648.52,1446.81 cw(c6680.16,1446.81) v2@6657.79,1469.18 ; 6648.52,1456.46 cw(c6670.51,1456.46) v2@6654.96,1472.01
  Bottom Layer w4: U65.4@5235.66,1454.4 cw(c5218.91,1437.65) 5242.6,1437.65 cw(c5266.28,1437.65) U65.4@5249.54,1454.4 ; U65.4@5238.49,1457.23 cw(c5228.57,1447.31) 5242.6,1447.31 cw(c5256.63,1447.31) U65.4@5246.71,1457.23 ; U65.4@5242.6,1465.12 5242.6,1435.04 5244.26,1433.37 5511.86,1433.37 5528.52,1450.04 5528.52,1500.04 5536.86,1508.37 5803.88,1508.37 6006.86,1305.39 6006.86,1211.36 6018.5,1199.71 6410.29,1199.71 6420,1190 6420,992.71 6430,982.71 6457.23,982.71 6555,1080.48 6555,1241.52 v1(6640.19,1326.71)
HOST_SRAM.A0: U30.F4 U47.1 | length 1654.4
  Top Layer w4: v1(7511.86,3366.71) 7512.86,3365.71 U47.1@7555.59,3365.71 ; v1@7515.75,3370.6 ccw(c7527.54,3382.4) 7527.54,3365.71 ; v1@7518.57,3359.99 cw(c7532.38,3346.18) U47.1@7532.38,3365.71 ; v1@7518.57,3373.43 ccw(c7537.2,3392.05) U47.1@7537.2,3365.71 ; U47.1@7532.37,3360.05 ccw(c7518.72,3346.4) 7518.72,3365.71 ccw(c7518.72,3385.02) U47.1@7532.37,3371.37
  Top Layer w8: U30.F4@7187.17,2120.91 v2(7206.85,2140.59) ; U30.F4@7187.17,2126.75 ccw(c7187.17,2140.85) 7197.14,2130.88 ccw(c7207.11,2120.91) U30.F4@7193.01,2120.91 ; v2@7197.85,2140.59 cw(c7176.12,2140.59) 7191.49,2125.23 cw(c7206.85,2109.86) v2@7206.85,2131.59
  MidLayer1 w4: v2@7195.85,2140.59 ccw(c7169.29,2140.59) 7188.07,2159.37 ccw(c7206.85,2178.15) v2@7206.85,2151.59 ; v2@7199.85,2140.59 ccw(c7182.95,2140.59) 7194.9,2152.54 ccw(c7206.85,2164.49) v2@7206.85,2147.59 ; v2(7206.85,2140.59) 7187.19,2160.25 7187.19,2334.35 7465.19,2612.35 7465.19,2791.71 7523.52,2850.04 7523.52,3319.69 7511.86,3331.35 v1(7511.86,3366.71)
HOST_SRAM.A1: U30.E1 U47.2 | length 1700.2
  Top Layer w4: U47.2@7555.59,3334.21 v1@7590.86,3334.21 ; U47.2@7574.56,3334.21 cw(c7574.56,3308.41) v1@7592.81,3326.66 ; U47.2@7578.61,3334.21 ccw(c7578.61,3354.28) v1@7592.81,3340.09 ; U47.2@7579.15,3328.93 cw(c7590.86,3318.62) v1@7590.86,3334.21 ; U47.2@7579.15,3339.5 ccw(c7590.86,3349.81) v1@7590.86,3334.21 ; 7584.22,3334.21 cw(c7584.22,3318.07) v1@7595.64,3329.49 ; v1(7599.52,3333.37) 7591.7,3333.37 v1@7590.86,3334.21
  Top Layer w8: U30.E1@7226.54,2239.02 v2(7246.22,2258.7) ; U30.E1@7226.54,2244.86 ccw(c7226.54,2258.96) 7236.51,2248.99 ccw(c7246.48,2239.02) U30.E1@7232.38,2239.02 ; v2@7237.22,2258.7 cw(c7215.49,2258.7) 7230.86,2243.34 cw(c7246.22,2227.97) v2@7246.22,2249.7
  MidLayer2 w4: v2@7238.44,2266.48 ccw(c7219.66,2285.26) 7246.22,2285.26 ccw(c7272.78,2285.26) v2@7254,2266.48 ; v2@7241.27,2263.65 ccw(c7229.32,2275.6) 7246.22,2275.6 ccw(c7263.12,2275.6) v2@7251.17,2263.65 ; v2(7246.22,2258.7) 7246.22,2300.07 7305.65,2359.5 7440.19,2494.04 7440.19,2701.04 7647.52,2908.37 7698.52,2908.37 7706.86,2916.71 7706.86,3280.04 7653.52,3333.37 v1(7599.52,3333.37) ; v1@7603.41,3329.49 cw(c7612.8,3320.1) 7612.8,3333.37 cw(c7612.8,3346.65) v1@7603.41,3337.26 ; v1@7606.24,3326.66 cw(c7622.46,3310.44) 7622.46,3333.37 cw(c7622.46,3356.31) v1@7606.24,3340.09
HOST_SRAM.A2: U30.E3 U47.3 | length 1732.5
  Top Layer w4: v1(7397.19,2633.37) 7433.37,2633.37 7457.19,2657.19 7457.19,2846.73 7423.52,2880.39 7423.52,3075.04 7440.19,3091.71 7465.19,3091.71 7481.86,3075.04 7490.19,3075.04 7506.86,3091.71 7506.86,3286.05 7523.52,3302.72 ; v1@7401.08,2629.49 cw(c7410.47,2620.1) 7410.47,2633.37 cw(c7410.47,2646.65) v1@7401.08,2637.26 ; v1@7403.91,2626.66 cw(c7420.13,2610.44) 7420.13,2633.37 cw(c7420.13,2656.31) v1@7403.91,2640.09 ; U47.3@7531.27,3298.45 ccw(c7523.52,3293.56) 7523.52,3302.72 ; U47.3@7531.27,3306.99 cw(c7523.52,3311.87) 7523.52,3302.72 ; U47.3@7555.59,3302.72 7523.52,3302.72
  Top Layer w8: U30.E3@7226.54,2160.28 v2(7246.22,2179.96) ; U30.E3@7226.54,2166.12 ccw(c7226.54,2180.22) 7236.51,2170.25 ccw(c7246.48,2160.28) U30.E3@7232.38,2160.28 ; v2@7237.22,2179.96 cw(c7215.49,2179.96) 7230.86,2164.6 cw(c7246.22,2149.23) v2@7246.22,2170.96
  MidLayer2 w4: 7226.83,2211.74 cw(c7196.83,2181.74) v2@7239.23,2180.21 ; 7233.32,2205.24 cw(c7209.37,2181.29) v2@7243.22,2180.07 ; 7239.82,2198.75 cw(c7221.91,2180.84) v2@7247.22,2179.92 ; v2(7246.22,2179.96) 7246.22,2192.34 7226.52,2212.04 7226.52,2378.71 7390.19,2542.37 7390.19,2626.37 v1(7397.19,2633.37) ; 7390.19,2593.54 cw(c7437.02,2593.54) v1@7403.91,2626.66 ; 7390.19,2603.2 cw(c7427.37,2603.2) v1@7401.08,2629.49 ; 7390.19,2612.85 cw(c7417.71,2612.85) v1@7398.25,2632.31 ; 7390.19,2622.51 cw(c7408.05,2622.51) v1@7395.42,2635.14
HOST_SRAM.A3: U30.F8 U47.4 | length 2431.7
  Top Layer w4: U47.4@7555.59,3271.22 7608.38,3271.22 7673.52,3206.08 7673.52,3052.37 7631.86,3010.71 7631.86,2933.37 7740.19,2825.04 7740.19,2525.04 7756.86,2508.37 7756.86,2081.71 7680.07,2004.93 ; U47.4@7578.81,3265.56 cw(c7592.46,3251.91) 7592.46,3271.22 cw(c7592.46,3290.53) U47.4@7578.81,3276.88 ; v1@7585,1980.23 7655.23,1980.23 7680,2005 ; v1@7588.89,1976.11 cw(c7598.84,1966.16) 7598.84,1980.23 ; v1@7588.89,1983.89 ccw(c7597.72,1992.72) 7597.72,1980.23 ; v1@7591.72,1973.28 cw(c7608.5,1956.5) 7608.5,1980.23 ; v1@7591.72,1986.72 ccw(c7607.37,2002.37) 7607.37,1980.23
  Top Layer w8: U30.F8@7187.17,1963.43 v2(7206.85,1983.11) ; U30.F8@7187.17,1969.27 ccw(c7187.17,1983.37) 7197.14,1973.4 ccw(c7207.11,1963.43) U30.F8@7193.01,1963.43 ; v2@7197.85,1983.11 cw(c7176.12,1983.11) 7191.49,1967.75 cw(c7206.85,1952.38) v2@7206.85,1974.11
  MidLayer1 w4: v2(7206.85,1983.11) 7187.52,1963.78 7187.52,1933.37 7197.52,1923.37 7295.52,1923.37 7305.19,1913.71 7305.19,1891.71 7313.69,1883.2 7315.97,1883.2 7330.54,1868.63 7349.39,1868.63 7351.31,1866.71 7488.54,1866.71 7527.75,1827.5 7562.5,1827.5 7582.5,1847.5 7582.5,1932.5 7585,1935 v1(7585,1980) ; v1@7578.28,1973.28 cw(c7562.06,1957.06) 7585,1957.06 cw(c7607.94,1957.06) v1@7591.72,1973.28 ; v1@7581.11,1976.11 cw(c7571.72,1966.72) 7585,1966.72 cw(c7598.28,1966.72) v1@7588.89,1976.11
HOST_SRAM.A4: U30.D1 U47.5 | length 1480
  Top Layer w4: U47.5@7555.59,3239.72 v1(7600.52,3239.71) ; U47.5@7577.55,3239.72 cw(c7577.55,3216.73) v1@7593.81,3232.99 ; U47.5@7577.63,3239.72 ccw(c7577.63,3262.6) v1@7593.81,3246.43 ; U47.5@7578.81,3234.07 cw(c7592.46,3220.41) 7592.46,3239.72 cw(c7592.46,3259.04) U47.5@7578.81,3245.38 ; 7587.21,3239.72 cw(c7587.21,3226.39) v1@7596.64,3235.82 ; 7587.28,3239.72 ccw(c7587.28,3252.95) v1@7596.64,3243.6
  Top Layer w8: U30.D1@7265.91,2239.02 v2(7285.59,2258.7) ; U30.D1@7265.91,2244.86 ccw(c7265.91,2258.96) 7275.88,2248.99 ccw(c7285.85,2239.02) U30.D1@7271.75,2239.02 ; v2@7276.59,2258.7 cw(c7254.86,2258.7) 7270.23,2243.34 cw(c7285.59,2227.97) v2@7285.59,2249.7
  MidLayer1 w4: v2@7277.81,2266.48 ccw(c7259.03,2285.26) 7285.59,2285.26 ccw(c7312.15,2285.26) v2@7293.37,2266.48 ; v2@7280.64,2263.65 ccw(c7268.69,2275.6) 7285.59,2275.6 ; v2(7285.59,2258.7) 7285.59,2371.79 7297.5,2383.71 7343.71,2383.71 7490.19,2530.19 7490.19,2782.77 7548.52,2841.1 7548.52,3187.71 v1(7600.52,3239.71) ; 7285.59,2275.6 ccw(c7302.49,2275.6) v2@7290.54,2263.65 ; v1@7591.02,3239.71 cw(c7568.09,3239.71) 7584.31,3223.49 cw(c7600.52,3207.27) v1@7600.52,3230.21 ; v1@7595.02,3239.71 cw(c7581.75,3239.71) 7591.14,3230.32 cw(c7600.52,3220.93) v1@7600.52,3234.21
HOST_SRAM.A5: U30.B1 U47.18 | length 1087.4
  Top Layer w4: U47.18@7555.59,2830.28 7591.15,2830.28 ; U47.18@7579.09,2824.92 cw(c7591.15,2814.03) 7591.15,2830.28 ; U47.18@7579.09,2835.64 ccw(c7591.15,2846.53) 7591.15,2830.28 ; v1@7683.47,2556.76 ccw(c7667.26,2572.98) 7690.19,2572.98 ccw(c7713.13,2572.98) v1@7696.91,2556.76 ; v1@7686.3,2553.93 ccw(c7676.91,2563.32) 7690.19,2563.32 ccw(c7703.47,2563.32) v1@7694.08,2553.93 ; v1(7690.19,2550.04) 7690.19,2731.23 7591.15,2830.28
  Top Layer w8: U30.B1@7344.65,2239.02 v2(7364.33,2258.7) ; U30.B1@7344.65,2244.86 ccw(c7344.65,2258.96) 7354.62,2248.99 ccw(c7364.59,2239.02) U30.B1@7350.49,2239.02 ; v2@7355.33,2258.7 cw(c7333.6,2258.7) 7348.97,2243.34 cw(c7364.33,2227.97) v2@7364.33,2249.7
  Bottom Layer w4: v2(7364.33,2258.7) 7382.99,2277.35 ; v2@7364.36,2265.7 ccw(c7364.44,2282.33) 7376.2,2270.57 ccw(c7387.96,2258.81) v2@7371.33,2258.73 ; v2@7364.38,2269.7 ccw(c7364.51,2295.83) 7382.98,2277.35 ; v2@7375.33,2258.75 cw(c7401.46,2258.88) 7382.98,2277.35 ; v1@7682.98,2543.86 ccw(c7669.53,2532.31) 7669.53,2550.04 ; v1@7682.98,2556.23 cw(c7669.53,2567.77) 7669.53,2550.04 ; v1@7686.02,2546.46 ccw(c7678.23,2539.78) 7678.23,2550.04 ccw(c7678.23,2560.3) v1@7686.02,2553.62 ; v1(7690.19,2550.04) 7669.52,2550.04 ; 7382.99,2277.35 7384.17,2277.35 7398.52,2291.71 7411.19,2291.71 7669.52,2550.04
HOST_SRAM.A6: U30.C4 U47.19 | length 994.7
  Top Layer w4: U47.19@7555.59,2798.78 7583.79,2798.78 ; U47.19@7573.15,2798.78 cw(c7577.47,2785.94) 7587.05,2795.52 ; U47.19@7574.42,2794.99 cw(c7579.76,2779.11) v1@7591.61,2790.95 ; U47.19@7580.84,2796.56 cw(c7583.78,2795.71) 7583.78,2798.78 ; U47.19@7580.84,2801 ccw(c7583.78,2801.85) 7583.78,2798.78 ; v1(7599.86,2791.71) 7590.86,2791.71 7583.79,2798.78
  Top Layer w8: U30.C4@7305.28,2120.91 v2(7324.96,2140.59) ; U30.C4@7305.28,2126.75 ccw(c7305.28,2140.85) 7315.25,2130.88 ccw(c7325.22,2120.91) U30.C4@7311.12,2120.91 ; v2@7315.96,2140.59 cw(c7294.23,2140.59) 7309.6,2125.23 cw(c7324.96,2109.86) v2@7324.96,2131.59
  MidLayer1 w4: v2(7324.96,2140.59) 7344.19,2159.82 7344.19,2270 7344.19,2272.04 7344.19,2303.39 7506.86,2466.06 7506.86,2556.71 7556.86,2606.71 7556.86,2716.71 7599.86,2759.71 v1(7599.86,2791.71) ; v1@7593.14,2784.99 cw(c7576.92,2768.77) 7599.86,2768.77 cw(c7622.79,2768.77) v1@7606.57,2784.99 ; v1@7595.97,2787.82 cw(c7586.58,2778.43) 7599.86,2778.43 cw(c7613.14,2778.43) v1@7603.75,2787.82
HOST_SRAM.A7: U30.B2 U47.20 | length 1182.2
  Top Layer w4: U47.20@7555.59,2767.28 7622.95,2767.28 v1(7665.19,2725.04) ; U47.20@7578.81,2761.63 cw(c7592.46,2747.97) 7592.46,2767.28 cw(c7592.46,2786.6) U47.20@7578.81,2772.94 ; v1@7655.69,2725.04 ccw(c7632.76,2725.04) 7648.97,2741.26 ccw(c7665.19,2757.48) v1@7665.19,2734.54 ; v1@7659.69,2725.04 ccw(c7646.41,2725.04) 7655.8,2734.43 ccw(c7665.19,2743.82) v1@7665.19,2730.54
  Top Layer w8: U30.B2@7344.65,2199.65 v2(7364.33,2219.33) ; U30.B2@7344.65,2205.49 ccw(c7344.65,2219.59) 7354.62,2209.62 ccw(c7364.59,2199.65) U30.B2@7350.49,2199.65 ; v2@7355.33,2219.33 cw(c7333.6,2219.33) 7348.97,2203.97 cw(c7364.33,2188.6) v2@7364.33,2210.33
  MidLayer2 w4: v2@7353.33,2219.33 ccw(c7326.77,2219.33) 7345.55,2238.11 ccw(c7364.33,2256.89) v2@7364.33,2230.33 ; v2@7357.33,2219.33 ccw(c7340.43,2219.33) 7352.38,2231.28 ccw(c7364.33,2243.23) v2@7364.33,2226.33 ; v2(7364.33,2219.33) 7345.19,2238.47 7345.19,2268.37 7360.19,2283.37 7403.52,2283.37 7498.52,2378.37 7498.52,2683.37 7556.86,2741.71 7648.52,2741.71 v1(7665.19,2725.04) ; v1@7655.69,2725.04 ccw(c7632.76,2725.04) 7648.97,2741.26 ccw(c7665.19,2757.48) v1@7665.19,2734.54 ; v1@7659.69,2725.04 ccw(c7646.41,2725.04) 7655.8,2734.43 ccw(c7665.19,2743.82) v1@7665.19,2730.54
HOST_SRAM.A8: U30.C5 U47.21 | length 1233.5
  Top Layer w4: U47.21@7555.59,2735.79 7586.11,2735.79 ; U47.21@7580.3,2732.2 cw(c7586.11,2729.29) 7586.11,2735.79 ; U47.21@7580.3,2739.37 ccw(c7586.11,2742.29) 7586.11,2735.79 ; v1@7605.69,2706.71 ccw(c7582.76,2706.71) 7598.97,2722.93 ccw(c7615.19,2739.14) v1@7615.19,2716.21 ; v1@7609.69,2706.71 ccw(c7596.41,2706.71) 7605.8,2716.1 ccw(c7615.19,2725.49) v1@7615.19,2712.21 ; v1(7615.19,2706.71) 7586.11,2735.79
  Top Layer w8: U30.C5@7305.28,2081.54 v2(7324.96,2101.22) ; U30.C5@7305.28,2087.38 ccw(c7305.28,2101.48) 7315.25,2091.51 ccw(c7325.22,2081.54) U30.C5@7311.12,2081.54 ; v2@7315.96,2101.22 cw(c7294.23,2101.22) 7309.6,2085.86 cw(c7324.96,2070.49) v2@7324.96,2092.22
  MidLayer1 w4: v2(7324.96,2101.22) 7345.19,2121.45 7345.19,2148.71 7357.19,2160.71 7431.86,2160.71 7448.52,2177.37 7448.52,2298.04 7480.48,2330 v1(7540,2330) ; v1@7533.28,2323.28 ccw(c7517.06,2307.06) 7517.06,2330 ccw(c7517.06,2352.93) v1@7533.28,2336.72 ; v1@7536.11,2326.11 ccw(c7526.72,2316.72) 7526.72,2330 ccw(c7526.72,2343.28) v1@7536.11,2333.89
  MidLayer2 w4: v1(7540,2330) 7537.82,2330 7532.86,2325.04 7538.91,2331.09 7558.19,2350.37 7558.19,2436.37 7640.19,2518.37 7640.19,2681.71 v1(7615.19,2706.71) ; v1@7540,2339.5 ccw(c7540,2357.16) 7552.49,2344.67 ; v1@7545.5,2330 cw(c7564.05,2330) 7550.93,2343.12 ; v1@7549.5,2330 cw(c7577.71,2330) 7557.76,2349.95 ; v1@7615.19,2697.21 cw(c7615.19,2674.27) 7631.41,2690.49 cw(c7647.63,2706.71) v1@7624.69,2706.71 ; v1@7615.19,2701.21 cw(c7615.19,2687.93) 7624.58,2697.32 cw(c7633.97,2706.71) v1@7620.69,2706.71
HOST_SRAM.A9: U30.B3 U47.22 | length 1098.3
  Top Layer w4: v1@7516.02,2632.04 ccw(c7493.09,2632.04) 7509.31,2648.26 ccw(c7525.52,2664.48) v1@7525.52,2641.54 ; v1@7520.02,2632.04 ccw(c7506.75,2632.04) 7516.14,2641.43 ccw(c7525.52,2650.82) v1@7525.52,2637.54 ; v1(7525.52,2632.04) 7506.86,2650.71 7506.86,2692.04 7519.11,2704.29 ; U47.22@7532.29,2698.72 ccw(c7519.11,2685.91) 7519.11,2704.29 ; U47.22@7532.29,2709.87 cw(c7519.11,2722.67) 7519.11,2704.29 ; U47.22@7555.59,2704.29 7519.11,2704.29
  Top Layer w8: U30.B3@7344.65,2160.28 v2(7364.33,2179.96) ; U30.B3@7344.65,2166.12 ccw(c7344.65,2180.22) 7354.62,2170.25 ccw(c7364.59,2160.28) U30.B3@7350.49,2160.28 ; v2@7355.33,2179.96 cw(c7333.6,2179.96) 7348.97,2164.6 cw(c7364.33,2149.23) v2@7364.33,2170.96
  MidLayer1 w4: v2(7364.33,2179.96) 7384.41,2200.04 7415.19,2200.04 7423.52,2208.37 7423.52,2371.41 7531.86,2479.75 v1(7531.86,2510.71) ; v2@7364.33,2186.96 ccw(c7364.33,2203.86) 7376.28,2191.91 ccw(c7388.23,2179.96) v2@7371.33,2179.96 ; v2@7364.33,2190.96 ccw(c7364.33,2217.52) 7383.11,2198.74 ccw(c7401.89,2179.96) v2@7375.33,2179.96 ; v1@7525.14,2503.99 cw(c7508.92,2487.77) 7531.86,2487.77 cw(c7554.79,2487.77) v1@7538.57,2503.99 ; v1@7527.97,2506.82 cw(c7518.58,2497.43) 7531.86,2497.43 cw(c7545.14,2497.43) v1@7535.75,2506.82
  MidLayer2 w4: v1@7518.81,2625.32 cw(c7487.3,2593.82) 7531.86,2593.82 ; v1@7521.64,2628.15 cw(c7496.96,2603.47) 7531.86,2603.47 ; v1@7524.46,2630.98 cw(c7506.61,2613.13) 7531.86,2613.13 ; v1@7525.14,2517.43 ccw(c7508.92,2533.64) 7531.86,2533.64 ccw(c7554.79,2533.64) v1@7538.57,2517.43 ; v1(7525.52,2632.04) 7531.86,2625.71 v1(7531.86,2510.71) ; v1@7527.97,2514.6 ccw(c7518.58,2523.99) 7531.86,2523.99 ccw(c7545.14,2523.99) v1@7535.75,2514.6